# Altium PCB board.PcbDoc (part 1 of 2)
Units mm, origin at the board's own origin, x right, y up, seen from the top; angles counter-clockwise.
Board outline 50 x 15.5 mm, 4 copper layers (Top Layer, GND, PWR, Bottom Layer), stack 1.522 mm thick; 76 components, 98 nets, 369 pads, 198 vias.
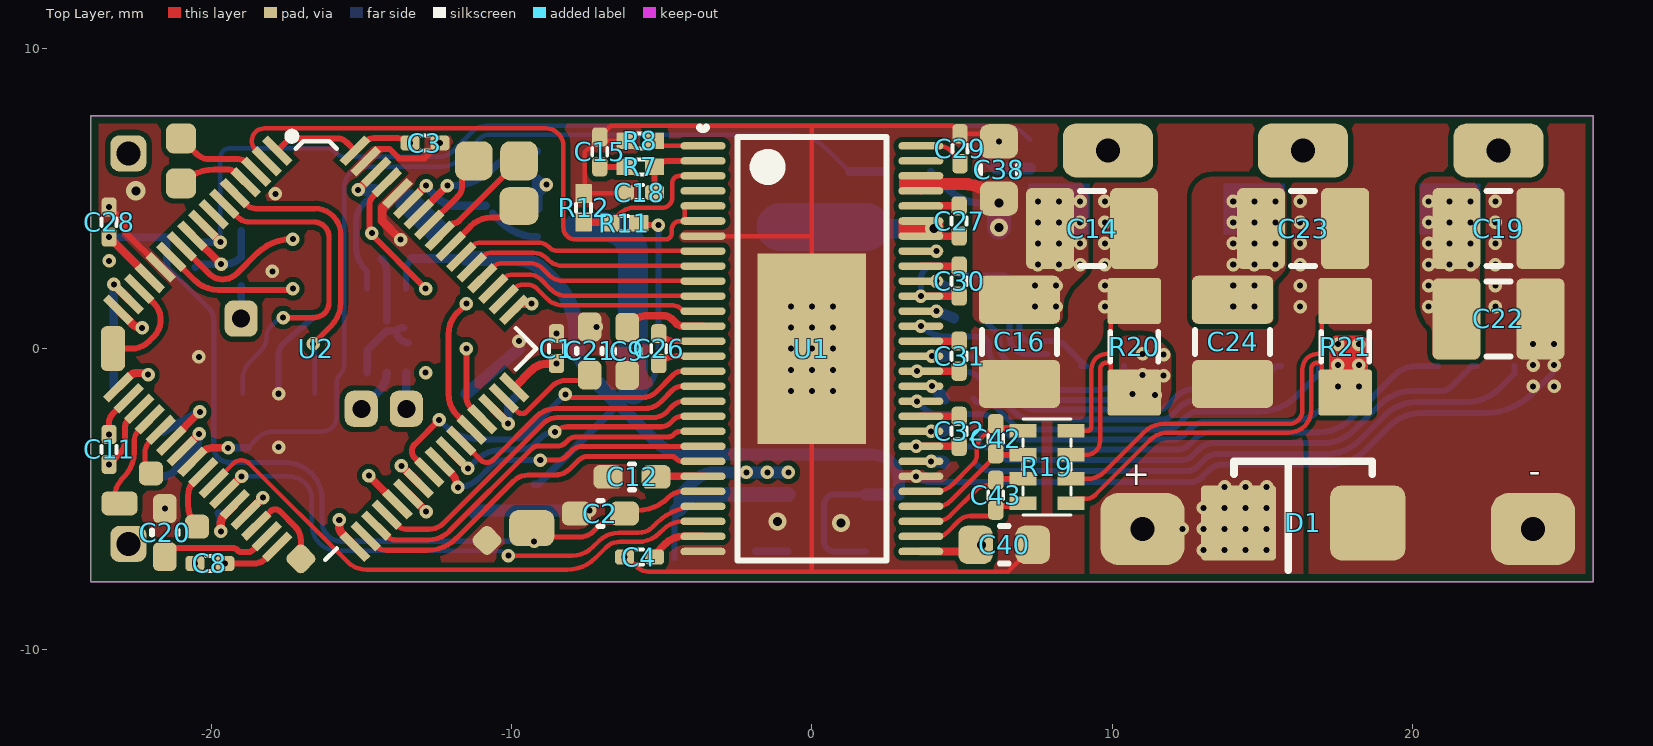
[diagram p0: Top Layer view]
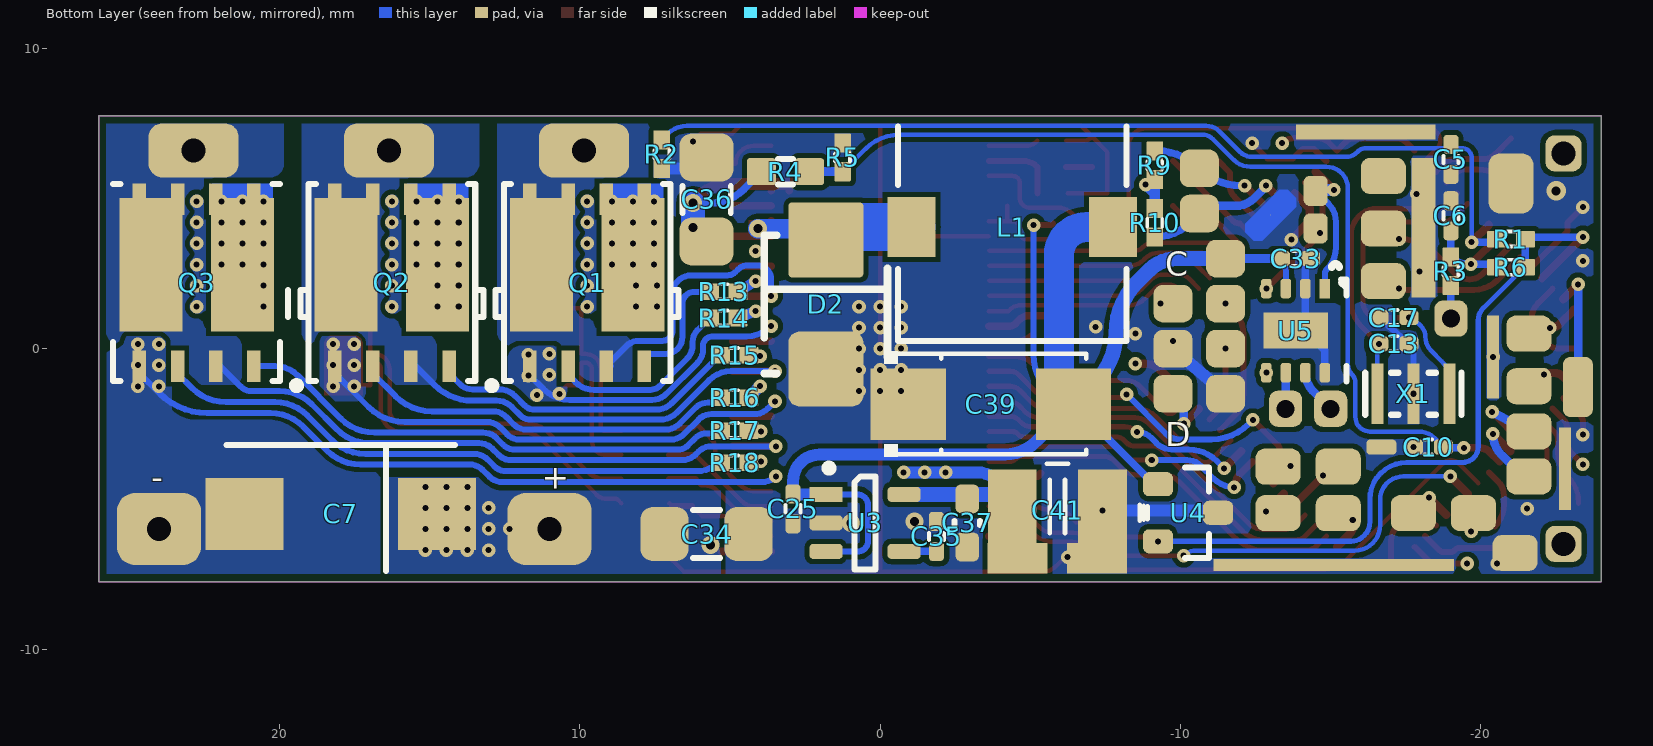
[diagram p1: Bottom Layer view, seen from below]
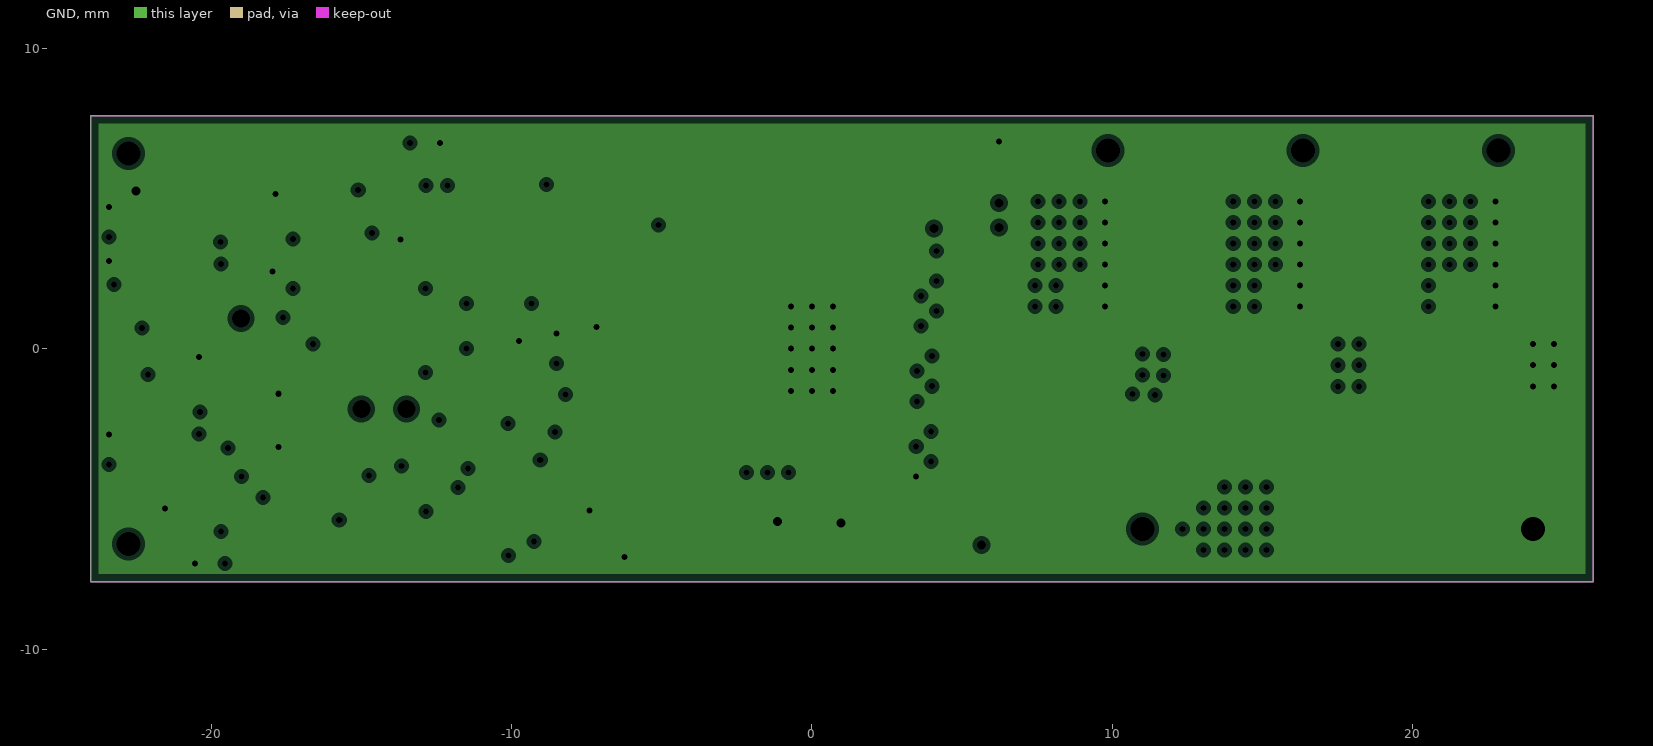
[diagram p2: GND, clearances drawn from the general rule]
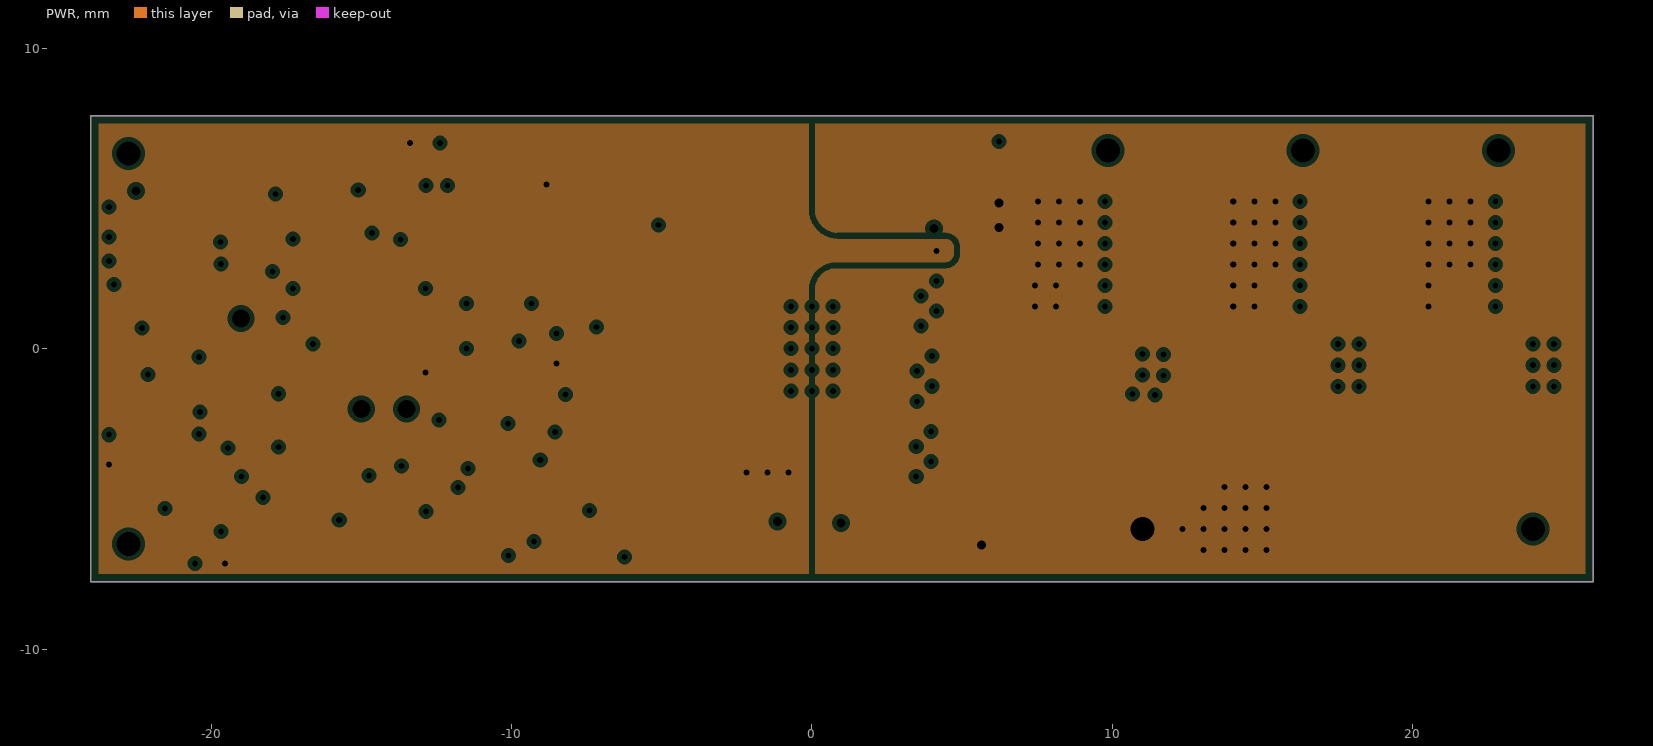
[diagram p3: PWR, clearances drawn from the general rule]
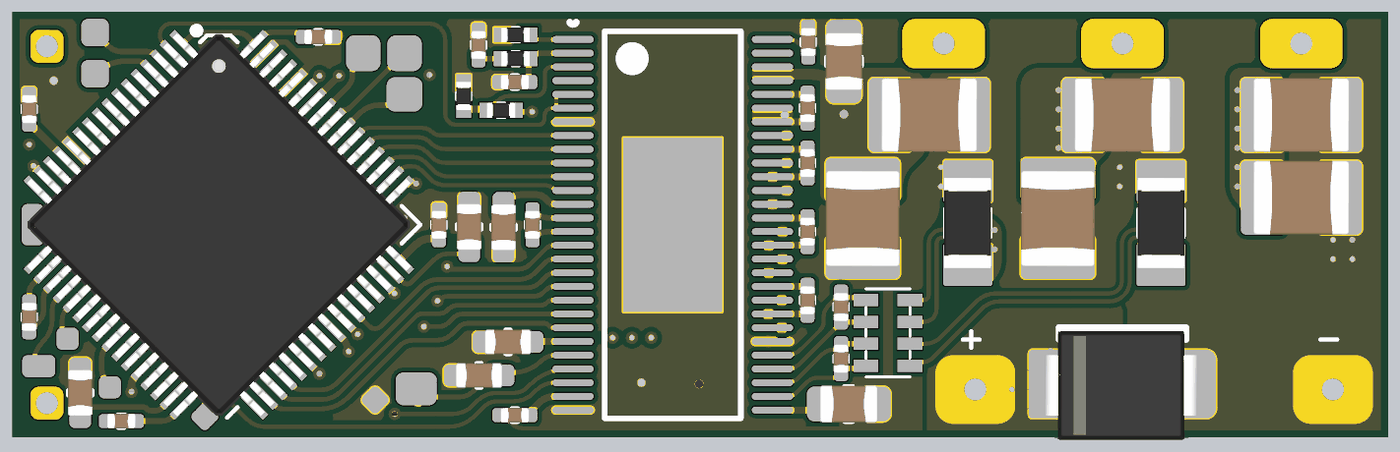
[diagram p5: 3D render of the assembled board from above, using the file's embedded part models]
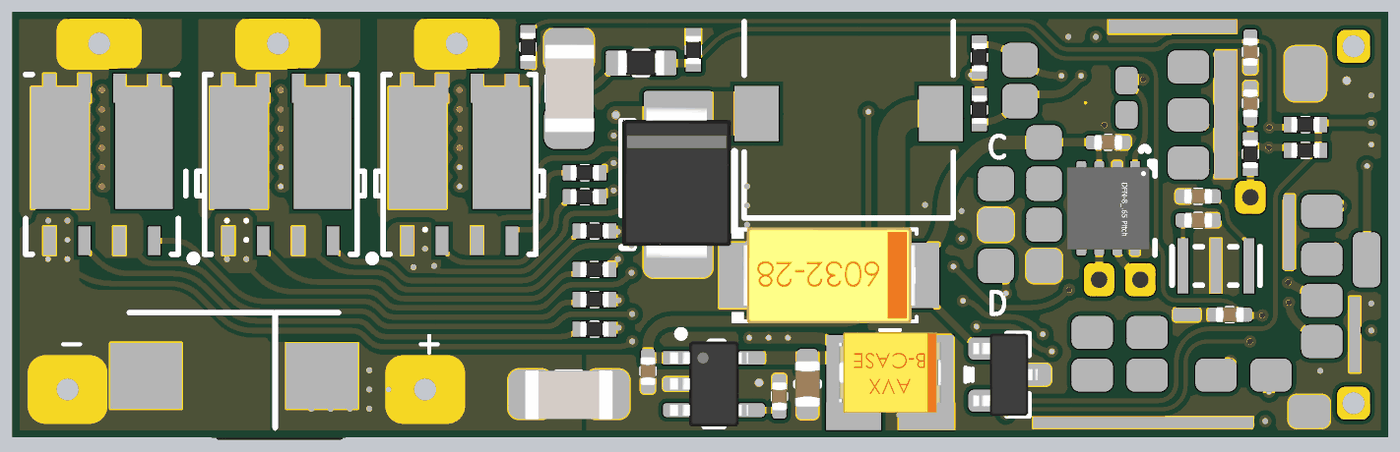
[diagram p6: 3D render of the assembled board from below, using the file's embedded part models]

## Layer stack, top to bottom
Top Solder: solder mask 0.01, Solder Resist, Dk 3.5
Top Layer: signal copper 0.018
Dielectric1: prepreg 0.125, FR-4, Dk 4.2
GND: plane copper 0.018, net GND
Dielectric 3: core 1.2, FR-4, Dk 4.6
PWR: plane copper 0.018, net (Multiple Nets)
Dielectric 4: core 0.125, FR-4, Dk 4.2
Bottom Layer: signal copper 0.018
Bottom Solder: solder mask 0.01, Solder Resist, Dk 3.5

## Board outline
-24,-7.75 26,-7.75 26,7.75 -24,7.75

## Design rules (kind name [scope] priority, off if disabled: settings)
AcuteAngle [All] p1: minimum=6.00000000000000E+0001 checktracksonly=FALSE
BoardOutlineClearance [All] p1: gap=0.25 ignorepadtopadclearanceinfootprint=FALSE
Clearance Clearance_1 [All] p1: gap=0.15 ignorepadtopadclearanceinfootprint=FALSE except(0.13: Arc-Arc Arc-Track Track-Track; 0.17: Arc-Fill Arc-Poly Arc-Region Track-Fill Track-Poly Track-Region SMDPad-Fill SMDPad-Poly SMDPad-Region THPad-Fill THPad-Poly THPad-Region Via-Fill Via-Poly Via-Region Fill-Fill Fill-Poly Fill-Region Poly-Poly Poly-Region Region-Region)
ComponentClearance [All] p1: gap=0.3 collisioncheckmode=3 verticalgap=0.254 showdistances=FALSE
HoleSize [All] p1: absolutevalues=TRUE maxlimit=6 minlimit=0.2 maxpercent=80.000 minpercent=20.000
HoleToHoleClearance HoleToHoleClearance_1 [IsVia vs IsThruPin] p1: gap=0.7 allowstackedmicrovias=TRUE
HoleToHoleClearance [All] p2: gap=0.5 allowstackedmicrovias=TRUE
PlaneClearance [All] p1: clearance=0.15
PlaneConnect [All] p1: planeconnectstyle=Direct reliefexpansion=0.3 reliefentries=4 reliefconductorwidth=0.381 reliefairgap=0.178
PolygonConnect [All] p1: connectstyle=Direct reliefconductorwidth=0.381 reliefentries=4 polygonreliefangle="90 Angle" airgapwidth=0.356
RoutingVias [All] p1: holewidth=0.3 width=0.6 viastyle="Through Hole" minholewidth=0.2 minwidth=0.45 maxholewidth=0.9 maxwidth=1.27
SolderMaskExpansion [All] p1: expansion=0.05 istentingtop=FALSE
SupplyNets "Schematic Supply Nets_3" [InNet('GND')] p1: voltage=0.000
SupplyNets "Schematic Supply Nets_9" [InNet('Ub')] p2: voltage=0.000
SupplyNets "Schematic Supply Nets_8" [InNet('3V3')] p3: voltage=0.000
SupplyNets "Schematic Supply Nets_2" [InNet('3V3_REF')] p4: voltage=0.000
SupplyNets "Schematic Supply Nets_1" [InNet('5V')] p5: voltage=0.000
UnRoutedNet [All] p1: checkbadconnections=TRUE
Width [All] p1: maxlimit=3.81 minlimit=0.14 preferedwidth=0.254
24 further rules are at their usual default settings.

## Components (designator, comment, footprint, x,y, rotation, side; value= is the part's Value field where it differs from the comment)
C1 "100nF" C0402 -8.5,0 r270 top
C2 "2.2uF" C0603 -7.041,-5.486 r0 top
C3 "100nF" C0402 -12.883,6.845 r180 top
C4 "2.2uF" C0402 -5.739,-6.934 r0 top
C5 "100n" C0402 -19,6.3 r90 bottom
C6 "100n" C0402 -19,4.424 r270 bottom
C7 "15uF 75V" RR_7343 17.951,-5.5 r0 bottom value="CAP TANT POLY 15UF 75V 7343 75mOhm"
C8 "100nF" C0402 -20.041,-7.15 r0 top
C9 "2.2uF" C0603 -6.15,-0.089 r90 top
C10 "100n" C0402 -18.25,-3.275 r180 bottom
C11 "100nF" C0402 -23.393,-3.353 r270 top
C12 "2.2uF" C0603 -5.987,-4.267 r0 top
C13 "18pF" C0402 -17.1,0.163 r0 bottom
C14 "2u2 100V" C1210-1.8MM 9.326,4 r180 top
C15 "6.8n" C0402 -7.061,6.551 r270 top
C16 "2u2 100V" C1210-1.8MM 6.909,0.229 r90 top
C17 "18pF" C0402 -17.1,1.037 r180 bottom
C18 "120p" C0402 -5.739,5.199 r0 top
C19 "2u2 100V" C1210-1.8MM 22.85,4 r180 top
C20 "2.2uF" C0603 -21.539,-6.121 r270 top
C21 "2.2uF" C0603 -7.4,-0.076 r270 top
C22 "2u2 100V" C1210-1.8MM 22.85,0.99 r180 top
C23 "2u2 100V" C1210-1.8MM 16.35,4 r180 top
C24 "2u2 100V" C1210-1.8MM 14,0.229 r90 top
C25 "100nF" C0402 2.9,-5.33 r90 bottom
C26 "22n" C0402 -5.098,0 r270 top
C27 "100n" C0402 4.9,4.25 r90 top
C28 "1uF" C0402 -23.393,4.212 r270 top
C29 "10nF" C0402 4.928,6.655 r270 top
C30 "220n" C0402 4.9,2.25 r90 top
C31 "220n" C0402 4.9,-0.25 r90 top
C32 "220n" C0402 4.9,-2.75 r90 top
C33 "100nF" C0402 -13.83,3 r0 bottom
C34 "2.2u" C1206 5.775,-6.17 r0 bottom
C35 "10nF" C0402 -1.875,-6.25 r270 bottom
C36 "2.2u" C1206 5.775,4.966 r270 bottom
C37 "2.2uF" C0603 -2.9,-5.8 r90 bottom
C38 "100nF" C0805 6.223,5.948 r270 top
C39 "220u" C6028 -3.689,-1.844 r0 bottom
C40 "100nF" C0805 6.401,-6.528 r180 top
C41 "100u" C3528 -5.9,-5.385 r0 bottom
C42 "1n" C0402 6.121,-2.997 r90 top
C43 "1n" C0402 6.121,-4.877 r90 top
D1 "SMF54A" SMB 16.35,-5.8 r180 top value="TVS DIODE 54VWM 87.1VC SOD123F"
D2 "CDBB2100" SMB 1.803,1.473 r90 bottom value="TVS DIODE 54VWM 87.1VC SOD123F"
L1 "33uH" RR_IND_DR74 -4.4,4.05 r180 bottom
Q1 "SI7252DP" PQFN_5X6 9.75,2.2 r270 bottom
Q2 "SI7252DP" PQFN_5X6 16.25,2.2 r270 bottom
Q3 "SI7252DP" PQFN_5X6 22.75,2.2 r270 bottom
R1 "10k" R0402 -21,3.647 r0 bottom
R2 "10k NTC" R0402 7.264,6.477 r270 bottom
R3 "10k" R0402 -19,2.575 r270 bottom
R4 "39k" R0603 3.15,5.89 r0 bottom
R5 "2k2" R0402 1.25,6.366 r270 bottom
R6 "10k" R0402 -21,2.71 r0 bottom
R7 "15k" R0402 -5.715,6.051 r180 top
R8 "220k" R0402 -5.715,6.918 r0 top
R9 "2k" R0402 -9.144,6.102 r270 bottom
R10 "2k" R0402 -9.144,4.195 r90 bottom
R11 "18k" R0402 -6.239,4.171 r0 top
R12 "3k3" R0402 -7.6,4.69 r270 top
R13 "4R7" R0402 5.2,1.895 r0 bottom
R14 "4R7" R0402 5.2,1.022 r0 bottom
R15 "4R7" R0402 4.844,-0.225 r0 bottom
R16 "4R7" R0402 4.844,-1.631 r0 bottom
R17 "4R7" R0402 4.844,-2.725 r0 bottom
R18 "4R7" R0402 4.844,-3.801 r0 bottom
R19 "100" RR_1206_ARRAY_4X 7.823,-4.737 r270 top
R20 "20mR" R1206 10.726,0.064 r270 top
R21 "20mR" R1206 17.75,0.064 r270 top
U1 "DRV8301DCAR" RR_HTSSOP56 0,0 r180 top value="DRV 8301 - IC MOTOR CONTROLLER SPI 56HTSSOP"
U2 "STM32F405RGT6" LQFP-64 -16.5,0 r315 top
U3 "TPS73233DBVT" SOT-23-5 0.5,-5.8 r0 bottom value="LDO 3.3V 250mA"
U4 "LT1460KCS3-3.3" SOT-23 -10.25,-5.461 r0 bottom
U5 "SIT1042QTK/3" DFN8_3X3_P065 -13.83,0.6 r270 bottom
X1 "CSTCE8M00G55-R0" RR_CRYSTAL_3.2X1.3 -17.75,-1.5 r0 bottom value="CER RES 8.0000MHZ 33PF SMD"

## Footprints (in the part's own frame and the unit in brackets; to place one, negate y for a bottom-side part, rotate by r counter-clockwise, add the part's x,y. Pads: shape width x height; smd on the part's side, far side on the other; paste and mask are expansions set on the pad)
C0402 [mm] "Chip Capacitor Body"
  rrect50% 0.635x0.508 smd mask+0.05: 1(-0.5,0) 2(0.5,0)
  silkscreen extent -0.13,-0.25 0.13,0.25, body extent -0.52,-0.27 0.53,0.28, height 0.55
C0603 [mil] "Chip Capacitor"
  rrect50% 38x31 smd mask+1.97: 1(-31.5,0) 2(31.5,0)
  silkscreen extent -3,-17 3,17, body extent -33,-18 33,18, height 35
C0805 [mil] "Chip Capacitor"
  rrect50% 45x50 smd mask+1.97: 1(-37.5,0) 2(37.5,0)
  silkscreen extent -6,-25 6,25, body extent -41,-27 41,27, height 53
C1206 [mm] "Chip Capacitor"
  rrect50% 1.6x1.8 smd: 1(-1.4,0) 2(1.4,0)
  silkscreen extent -0.45,-0.8 0.45,0.8, body extent -1.6,-0.88 1.6,0.92, height 1.6
C1210-1.8MM [mm] "Chip Capacitor"
  rrect25% 1.6x2.7 smd mask+0.05: 1(-1.4,0) 2(1.4,0)
  silkscreen extent -0.4,-1.25 0.4,1.25, body extent -1.75,-1.35 1.75,1.35, height 1.8
C3528 [mil] "C3528_1"
  rect 64x108 smd: 1(-59.06,0) 2(59.06,0)
  silkscreen extent -118,-61 14,30, body extent -73,-58 73,58, height 80
C6028 [mm] "C6028 C"
  rect 2.5x2.376 smd paste+0 mask+0.051: 1(2.75,0) 2(-2.75,0)
  silkscreen extent -3.18,-1.75 3.56,1.75, body extent -3.15,-1.75 3.15,1.75, height 2.8
DFN8_3X3_P065 [mm]
  rect 0.65x0.35 smd mask+0.05: 1(-1.4,0.975)
  rrect50% 0.65x0.35 smd mask+0.05: 2(-1.4,0.325) 3(-1.4,-0.325) 4(-1.4,-0.975) 5(1.4,-0.975) 6(1.4,-0.325) 7(1.4,0.325) 8(1.4,0.975)
  rect 1.2x2.15 smd mask+0.05: 9(0,0)
  silkscreen extent -2.23,1.2 1.7,1.7, body extent -1.51,-1.5 1.51,1.5, height 0.8
LQFP-64 [mil]
  rect 46x11 smd mask+0.98: 1(-219.5,147.64) 2(-219.5,127.95) 3(-219.5,108.27) 4(-219.5,88.58) 5(-219.5,68.9) 6(-219.5,49.21) 7(-219.5,29.53) 8(-219.5,9.84) 9(-219.5,-9.84) 10(-219.5,-29.53) 11(-219.5,-49.21) 12(-219.5,-68.9) 13(-219.5,-88.58) 14(-219.5,-108.27) 15(-219.5,-127.95) 16(-219.5,-147.64) 33(219.5,-147.64) 34(219.5,-127.95) 35(219.5,-108.27) 36(219.5,-88.58) 37(219.5,-68.9) 38(219.5,-49.21) 39(219.5,-29.53) 40(219.5,-9.84) 41(219.5,9.84) 42(219.5,29.53) 43(219.5,49.21) 44(219.5,68.9) 45(219.5,88.58) 46(219.5,108.27) 47(219.5,127.95) 48(219.5,147.64)
  rect 11x46 smd mask+0.98: 17(-147.64,-219.5) 18(-127.95,-219.5) 19(-108.27,-219.5) 20(-88.58,-219.5) 21(-68.9,-219.5) 22(-49.21,-219.5) 23(-29.53,-219.5) 24(-9.84,-219.5) 25(9.84,-219.5) 26(29.53,-219.5) 27(49.21,-219.5) 28(68.9,-219.5) 29(88.58,-219.5) 30(108.27,-219.5) 31(127.95,-219.5) 32(147.64,-219.5) 49(147.64,219.5) 50(127.95,219.5) 51(108.27,219.5) 52(88.58,219.5) 53(68.9,219.5) 54(49.21,219.5) 55(29.53,219.5) 56(9.84,219.5) 57(-9.84,219.5) 58(-29.53,219.5) 59(-49.21,219.5) 60(-68.9,219.5) 61(-88.58,219.5) 62(-108.27,219.5) 63(-127.95,219.5) 64(-147.64,219.5)
  silkscreen extent -224,-187 204,204, body extent -236,-236 236,236, height 59
PQFN_5X6 [mm]
  rect 1.05x0.45 smd mask+0.05: 1(2.78,-1.905) 2(2.78,-0.635) 3(2.78,0.635) 4(2.78,1.905) 5(-2.78,1.905) 6(-2.78,0.635) 7(-2.78,-0.635) 8(-2.78,-1.905)
  rect 4.44x2.1 smd mask+0.05: 6(-0.6,1.524) 8(-0.6,-1.524)
  silkscreen extent -3.28,-3.3 3.55,3.05, body extent -3.13,-2.63 3.13,2.63, height 1.17
R0402 [mm]
  rrect10% 0.635x0.55 smd mask+0.05: 1(-0.476,0) 2(0.476,0)
  silkscreen extent -0.12,-0.25 0.13,0.25, body extent -0.52,-0.27 0.53,0.28, height 0.4
R0603 [mil] "Chip Resistor; Body 1.6 x 0.8 mm (LxW typ)"
  rrect20% 38x35.43 smd mask+1.97: 1(-31.5,0) 2(31.5,0)
  silkscreen extent -10,-17 10,17, body extent -33,-18 33,18, height 22
R1206 [mil] "Chip Resistor"
  rrect10% 60x70 smd mask+1.97: 1(-60,0) 2(60,0)
  silkscreen extent -20,-31 20,31, body extent -65,-33 65,33, height 26
RR_1206_ARRAY_4X [mm]
  rect 0.45x0.9 smd mask+0.05: 1(0.4,-0.8) 2(0.4,0.8) 3(-0.4,-0.8) 4(-0.4,0.8) 5(-1.2,-0.8) 6(-1.2,0.8) 7(-2,-0.8) 8(-2,0.8)
  silkscreen extent -2.4,-0.8 0.8,0.8, body extent -2.4,-0.8 0.8,0.8, height 1
RR_7343 [mm] "Capacitor, SM Tantalum; Body 7.3 x 4.3 mm (LxW typ)"
  rect 2.6x2.4 smd mask+0.05: 1(-3.2,0) 2(3.2,0)
  silkscreen extent -3.8,-2.3 3.8,1.9, body extent -3.65,-2.15 3.65,2.15, height 4.5
RR_CRYSTAL_3.2X1.3 [mm]
  rect 0.4x2 smd mask+0.05: 1(1.2,0) 2(0,0) 3(-1.2,0)
  silkscreen extent -1.6,-0.7 1.6,0.7, body extent -1.6,-0.7 1.6,0.7, height 0.9
RR_HTSSOP56 [mm]
  oval 1.5x0.25 smd mask+0.05: 1(3.625,-6.75) 2(3.625,-6.25) 3(3.625,-5.75) 4(3.625,-5.25) 5(3.625,-4.75) 6(3.625,-4.25) 7(3.625,-3.75) 8(3.625,-3.25) 9(3.625,-2.75) 10(3.625,-2.25) 11(3.625,-1.75) 12(3.625,-1.25) 13(3.625,-0.75) 14(3.625,-0.25) 15(3.625,0.25) 16(3.625,0.75) 17(3.625,1.25) 18(3.625,1.75) 19(3.625,2.25) 20(3.625,2.75) 21(3.625,3.25) 22(3.625,3.75) 23(3.625,4.25) 24(3.625,4.75) 25(3.625,5.25) 26(3.625,5.75) 27(3.625,6.25) 28(3.625,6.75) 29(-3.625,6.75) 30(-3.625,6.25) 31(-3.625,5.75) 32(-3.625,5.25) 33(-3.625,4.75) 34(-3.625,4.25) 35(-3.625,3.75) 36(-3.625,3.25) 37(-3.625,2.75) 38(-3.625,2.25) 39(-3.625,1.75) 40(-3.625,1.25) 41(-3.625,0.75) 42(-3.625,0.25) 43(-3.625,-0.25) 44(-3.625,-0.75) 45(-3.625,-1.25) 46(-3.625,-1.75) 47(-3.625,-2.25) 48(-3.625,-2.75) 49(-3.625,-3.25) 50(-3.625,-3.75) 51(-3.625,-4.25) 52(-3.625,-4.75) 53(-3.625,-5.25) 54(-3.625,-5.75) 55(-3.625,-6.25) 56(-3.625,-6.75)
  rect 3.61x6.35 smd mask+0.05: 57(0,0)
  silkscreen extent -2.48,-7.37 3.74,7.05, body extent -3.1,-7.05 3.1,7.05, height 1.1
RR_IND_DR74 [mm] "Precision Wire Wound Inductor, 2-Leads, Body 7,60x7,60mm, IPC High Density"
  rect 1.6x2 smd mask+0.05: 1(-3.35,0) 2(3.35,0)
  silkscreen extent -3.8,-3.8 3.8,3.35, body extent -3.8,-3.8 3.8,3.8, height 4.35
SMB [mm]
  rrect30% 2.5x2.5 smd mask+0.05: 1(-2.15,0)
  rrect10% 2.5x2.5 smd mask+0.05: 2(2.15,0)
  silkscreen extent -2.3,-2.05 2.3,1.57, body extent -2.75,-1.93 2.85,2.02, height 2.65
SOT-23 [mm]
  rrect50% 1x0.8 smd mask+0.05: 1(1,-0.95) 2(1,0.95) 3(-1,0)
  silkscreen extent -0.7,-1.5 0.1,1.5, body extent -1.27,-1.5 1.33,1.5, height 1.1
SOT-23-5 [mm]
  rect 1.1x0.5 smd mask+0.05: 1(1.3,-0.95)
  rrect50% 1.1x0.5 smd mask+0.05: 2(1.3,0) 3(1.3,0.95) 4(-1.3,0.95) 5(-1.3,-0.95)
  silkscreen extent -0.35,-1.95 1.33,1.55, body extent -1.6,-1.55 1.6,1.55, height 1.45

## Part data
C1 C2 C3 C4 C8 C9 C11 C12 C15 C18 C25 C27 C29 C35 C37 C38 C40: library part CAP, "100nF 0402"
C5 C6 C10 C34 C36: library part CAP
C7: library part "Cap Pol2", "Polarized Capacitor (Axial)", Package=X, Distributor=KEMET, LatestRevisionDate=17-Jul-2002, LatestRevisionNote="Re-released for DXP Platform.", Order Number=T521X156M075ATE0357280, PackageDescription="Polarized Capacitor; 2 Leads", Published=8-Jun-2000, Publisher="Altium Limited"
C13 C17: library part CAP, "18pF 0402"
C14 C16 C19 C22 C23 C24: library part CAP, "2u2 100V 1210", LCSC part number=C92775, P/N=HMK325B7225KN-T
C20 C21: library part CAP, "2.2uF 0603"
C26 C30 C31 C32 C39 C41 C42 C43: library part CAP, LCSC part number=C56392, P/N=0402B104K250NT
C28: library part CAP, "1uF 0603"
C33: library part CAP, "100nF 50V 0402", LCSC part number=C110251, P/N=0402B104K500NT
D1 D2: library part Diode, "Default Diode", Package=SOD123F, Distributor="Littelfuse Inc.", Order Number=SMF54A
L1: library part 4.7uH, LCSC part number=C167208, P/N=FXL0420-4R7-M
Q1 Q2 Q3: library part SI7252DP-T1-GE3
R1 R3 R4 R5 R6 R7 R8 R11 R12: library part RES
R2: library part RES, "10k NTC 3380K 0402", LCSC part number=C77131, P/N=NCP15XH103F03RC
R9 R10 R19: library part RES, LCSC part number=C138007, P/N=RC0402FR-0730RL
R13 R14 R15 R16 R17 R18: library part RES, "4R7 0402", LCSC part number=C138007, P/N=RC0402FR-0730RL
R20 R21: library part RES, "5mR shunt 2512"
U1: library part DRV8301, Package=HTSSOP56, Distributor="Texas Instruments", Order Number=DRV8301DCAR
U2: library part STM32F405, "STM32 ARM-based 32-bit MCU"
U3: library part TPS7xx33, Package=SOT23-5, Distributor="Texas Instruments", Order Number=TPS73233DBVT
U4: library part NCP51460SN33T1G, "REF3033AIDBZR", LCSC part number=C36658, P/N=REF3033AIDBZR
U5: library part LTC2875, "IC INTERFACE CAN", LCSC part number=C5308062, P/N=SIT1042QTK/3
X1: library part CRYSTAL_3P, Package="3-SMD, Non-Standard", Distributor="Murata Electronics", Order Number=CSTCE8M00G55-R0

## Free pads (board coordinates)
  rrect50% 0.8x1.5 smd: 7(-23.265,0.003)
  rrect50% 1x2 smd far side: 7(-23.225,-1.275)
  rrect50% 1.2x0.8 smd: 7(-23.047,-5.15)
  rrect50% 0.8x0.8 smd: 7(-22,-4.15) 7(-20.462,-5.923)
  rrect50% 1.5x1.2 smd far side: 7(-21.6,-4.25) 7(-21.6,-2.75) 7(-21.6,-1.25) 7(-21.6,0.5) 7(-21.14,-6.8) 7(-19.75,-5.475) 7(-17.75,-5.475) 7(-16.75,2.25) 7(-16.75,4) 7(-16.75,5.75) 7(-15.25,-5.475) 7(-15.25,-3.925) 7(-13.25,-5.475) 7(-13.25,-3.925)
  rrect50% 1x1 smd: 7(-21,5.5) 7(-21,7)
  rrect50% 1.5x2 smd far side: 7(-21,5.5)
  rrect50% 0.8x0.8 smd rot 45: 7(-17.011,-6.994) 7(-10.817,-6.382)
  rrect50% 1x0.5 smd far side: 7(-16.687,-3.275)
  rrect50% 0.8x1 smd far side: 7(-14.5,4) 7(-14.5,5.25)
  rrect50% 1.3x1.25 smd far side: 7(-11.5,-1.5) 7(-11.5,0) 7(-11.5,1.5) 7(-11.5,3) 7(-10.625,4.5) 7(-10.625,6) 7(-9.75,1.5) 7(-9.75,-1.5) 7(-9.75,0)
  rrect50% 1.25x1.3 smd: 7(-11.25,6.25) 7(-9.75,6.25)
  rrect50% 1.3x1.25 smd: 7(-9.75,4.75)
  rrect50% 1.5x1.2 smd: 7(-9.325,-5.975)
  rect 2x1 smd far side: 9(-7.225,-6.975) 9(-4.575,-6.975)
  rect 0.4x2.75 smd far side: 10(-22.796,-4) 10(-20.404,-0.275)
  rect 0.8x4.65 smd far side: 10(-18.091,4.025)
  rect 4.65x0.5 smd far side: 10(-16.166,7.214)
  rect 8x0.4 smd far side: 10(-15.1,-7.2)
  round 0.025 smd far side: 10(-13.005,4.445)
  rrect50% 2.8x2.4 hole 0.8: +(11,-6) -(24,-6)
  rrect50% 1.2x1.2 hole 0.8: -(-22.75,-6.5) -(-22.75,6.5)
  rrect50% 1.1x1.2 hole 0.6: -(-19,1) -(-15,-2) -(-13.5,-2)
  rrect50% 3x1.8 hole 0.8: PH(9.85,6.6) PH(16.35,6.6) PH(22.85,6.6)

## Via types
v1: diameter 0.45, hole 0.2, Top Layer to Bottom Layer, tented both sides, 182 vias
v2: diameter 0.6, hole 0.3, Top Layer to Bottom Layer, tented both sides, 6 vias
v3: diameter 0.45, hole 0.2, Top Layer to Bottom Layer, tented bottom, 5 vias
v4: diameter 0.45, hole 0.2, Top Layer to Bottom Layer, tented top, 3 vias
v5: diameter 0.65, hole 0.3, Top Layer to Bottom Layer, 1 vias
v6: diameter 0.45, hole 0.2, Top Layer to Bottom Layer, 1 vias

## Nets (pads, with @x,y where several pads share a name; then routed paths per layer and width w, separated by ;. In a path a pad name is that pad's centre, name@x,y a point inside that pad or via, vN(x,y) a via of type N, cw(c..) or ccw(c..) an arc to the next point about the centre after c; other vN are vias at no path point)
3V3: C1.2 C3.2 C8.2 C11.2 C37.2 C41.2 pad.9@-4.575,-6.975 R9.2 R10.2 U1.49 U2.1 U2.19 U2.32 U2.48 U2.64 U3.5 U5.5 | length 22.9
  Top Layer w0.2: v4(-23.393,-3.853) -23.026,-3.486 ccw(c-23.398,-3.113) -22.872,-3.113 -22.872,-2.642 cw(c-22.487,-2.642) -22.759,-2.37 U2.19@-22.387,-1.998 ; v4(-19.541,-7.15) -18.561,-7.15 ccw(c-18.561,-6.633) -18.195,-6.999 U2.32@-17.79,-6.594 ; U2.1@-17.79,6.594 -17.529,6.855 cw(c-17.191,6.517) -17.191,6.995 -15.787,6.995 cw(c-15.787,6.567) -15.485,6.87 U2.64@-15.209,6.594 -14.943,6.86 cw(c-14.58,6.496) -14.58,7.01 -13.781,7.01 cw(c-13.781,6.447) v4(-13.383,6.845)
  Top Layer w0.28: U2.48@-9.906,-1.291 -9.329,-0.714 cw(c-8.813,-1.23) -8.813,-0.5 v1(-8.5,-0.5)
  Bottom Layer w0.2: pad.9@-4.575,-6.975 -4.575,-5.808 cw(c-3.977,-5.808) C41.2@-4.4,-5.385
  Bottom Layer w0.35: R10.2@-9.144,4.671 R9.2@-9.144,5.5 ; -9.144,5.154 -8.908,5.39 R9.2@-9.144,5.626
  Bottom Layer w0.4: C41.2@-3.915,-4.9 C41.2@-4.4,-5.385 -4.4,-5.285 -4.4,-4.876 -3.936,-4.412 cw(c-3.218,-5.13) -3.218,-4.115 v1(-2.184,-4.115) v1(-1.483,-4.115) v1(-0.781,-4.115)
  Bottom Layer w0.5: C41.2@-4.5,-5.385 -4.4,-5.285 -3.965,-4.85 U3.5@-0.8,-4.85
  other v1: -12.855,-0.8 4.146,3.25 -8.839,5.459
3V3_REF: C2.2 C28.2 pad.7@-9.325,-5.975 R1.1 R6.1 U1.24 U2.13 U4.2 | length 30.1
  Top Layer w0.17: v1(-9.25,-6.411) -9.112,-6.273 -7.743,-6.273 ccw(c-7.743,-5.608) -7.272,-6.079 -7.113,-5.919 cw(c-6.738,-6.294) -6.738,-5.764 -6.518,-5.764 C2.2@-6.241,-5.486 ; C2.2@-5.987,-5.486 -5.887,-5.387 -5.823,-5.387 ccw(c-5.823,-3.905) -4.775,-4.953 cw(c-4.285,-5.443) -4.285,-4.75 U1.24@-3.625,-4.75
  Top Layer w0.28: v1(-23.393,3.712) U2.13@-22.033,2.351
  Bottom Layer w0.17: R6.1@-21.476,2.709 -21.437,2.709 -20.076,1.348 cw(c-20.48,0.944) -19.909,0.944 -19.909,-3.266 ccw(c-19.388,-3.266) -19.388,-3.787 -17.53,-3.787 cw(c-17.53,-5.015) -16.301,-5.015 -16.301,-5.774 ccw(c-15.665,-5.774) -15.665,-6.411 v1(-9.25,-6.411)
  Bottom Layer w0.25: v1(-23.393,3.712) R1.1@-21.541,3.712 ; R6.1@-21.476,2.709 R1.1@-21.476,3.647
  Bottom Layer w0.28: R1.1@-21.541,3.712 R1.1@-21.476,3.647
5V: C25.2 C33.2 C39.2 L1.2 pad.7@-11.5,3 R11.2 U3.1 U3.3 U4.1 U5.3 | length 44.4
  Top Layer w0.2: R11.2@-5.763,4.171 ccw(c-5.627,4.308) -5.627,4.115 v1(-5.112,4.115)
  Bottom Layer w0.2: U5.3@-13.505,2 -13.505,2.578 cw(c-12.908,2.578) C33.2@-13.33,3 ; C39.2@-5.658,-1.521 ccw(c-6.976,-0.203) -5.112,-0.203 v1(-5.112,4.115) ; U3.3@1.8,-6.75 0.749,-6.75 cw(c0.749,-6.401) 0.4,-6.401 0.4,-5.21 cw(c0.76,-5.21) 0.76,-4.85 U3.1@1.8,-4.85
  Bottom Layer w0.25: U4.1@-9.25,-4.511 -9.105,-4.511 C39.2@-6.439,-1.844
  Bottom Layer w0.3: C33.2@-13.33,3 pad.7@-11.5,3
  Bottom Layer w0.4: C39.2@-6.439,-1.844 -5.196,-3.088 ccw(c-4.15,-2.042) -4.15,-3.521 2.011,-3.521 cw(c2.011,-4.41) 2.9,-4.41 C25.2@2.9,-4.83 ; U3.1@1.8,-4.85 C25.2@2.9,-4.85
  Bottom Layer w0.5: pad.7@-11.5,3 -9.886,3 cw(c-9.886,1.69) -8.96,2.616 -8.544,2.201 cw(c-10.22,0.525) -7.85,0.525 ccw(c-5.537,0.525) -7.172,-1.111 C39.2@-6.439,-1.844
  Bottom Layer w1: L1.2@-7.75,4.05 -6.881,4.05 cw(c-6.881,3.119) -5.95,3.119 C39.2@-5.95,-1.356
#A0: pad.7@-23.265,0.003 U2.14 | length 3.4
  Top Layer w0.2: pad.7@-23.265,0.003 -22.651,0.003 ccw(c-22.651,0.833) -22.064,0.246 -21.904,0.407 ccw(c-22.458,0.961) -21.904,1.515 U2.14@-22.387,1.998
#A1: pad.7@-23.225,-1.275 U2.15 | length 4.1
  Top Layer w0.28: v6(-23.238,2.142) U2.15@-22.74,1.644
  Bottom Layer w0.28: v6(-23.238,2.142) -23.238,-1.262 pad.7@-23.225,-1.275
#A2: pad.7@-21.6,0.5 U2.16 | length 1
  Top Layer w0.28: U2.16@-23.094,1.291 -22.635,0.832 ccw(c-22.293,1.173) v1(-22.293,0.69)
#A3: pad.7@-21.6,-1.25 U2.17 | length 1.2
  Top Layer w0.28: U2.17@-23.094,-1.291 -22.716,-0.913 cw(c-22.465,-1.164) -22.465,-0.809 -22.153,-0.809 v1(-22.095,-0.867)
#A4: pad.7@-23.047,-5.15 U2.20 | length 3.2
  Top Layer w0.17: pad.7@-23.25,-5.15 -23.25,-5.122 cw(c-22.005,-5.122) -22.885,-4.242 ccw(c-23.683,-3.445) -22.555,-3.445 -22.555,-3.048 cw(c-22.134,-3.048) -22.432,-2.75 U2.20@-22.033,-2.351
#A5: pad.7@-22,-4.15 U2.21 | length 1.8
  Top Layer w0.17: pad.7@-22,-4.25 cw(c-21.518,-3.768) -22.2,-3.768 -22.2,-3.48 cw(c-21.584,-3.48) -22.019,-3.045 U2.21@-21.679,-2.705
#A6: pad.7@-21.6,-2.75 U2.22 | length 2.7
  Top Layer w0.25: U2.22@-21.326,-3.058 v1(-20.371,-2.104)
  Bottom Layer w0.3: pad.7@-21.6,-2.75 v1(-20.371,-2.104)
#A7: pad.7@-21.6,-4.25 U2.23 | length 2.8
  Top Layer w0.28: U2.23@-20.972,-3.412 v1(-20.399,-2.838)
  Bottom Layer w0.28: pad.7@-21.6,-4.25 ccw(c-21.6,-3.759) -21.253,-4.106 -20.691,-3.545 ccw(c-21.398,-2.838) v1(-20.399,-2.838)
#B2: pad.7@-19.75,-5.475 U2.28 | length 1.7
  Top Layer w0.28: v1(-19.677,-6.084) -19.677,-5.852 cw(c-19.194,-5.852) -19.535,-5.511 U2.28@-19.205,-5.18
  Bottom Layer w0.28: pad.7@-19.75,-5.475 cw(c-19.927,-5.652) -19.677,-5.652 v1(-19.677,-6.084)
#B3: pad.7@-9.75,4.75 U2.55 | length 2.8
  Top Layer w0.2: U2.55@-12.027,3.412 -11.361,4.078 cw(c-10.683,3.401) -10.683,4.359 -10.141,4.359 pad.7@-9.75,4.75
#B4: pad.7@-9.75,6.25 U2.56 | length 3.6
  Top Layer w0.2: U2.56@-12.381,3.766 -11.98,4.166 ccw(c-11.98,4.519) -11.731,4.269 pad.7@-9.75,6.25
#B5: pad.7@-11.25,6.25 U2.57 | length 2.7
  Top Layer w0.2: U2.57@-12.734,4.119 -11.792,5.061 ccw(c-12.144,5.414) -11.646,5.414 -11.646,5.854 pad.7@-11.25,6.25
#B6_SCL: pad.7@-10.625,6 R9.1 U2.58 | length 4.6
  Top Layer w0.25: U2.58@-13.088,4.473 v3(-12.133,5.427)
  Bottom Layer w0.25: v3(-12.133,5.427) -12.008,5.427 ccw(c-12.008,7.383) pad.7@-10.625,6 cw(c-9.231,4.606) -9.231,6.578 R9.1@-9.144,6.578
#B7_SDA: pad.7@-10.625,4.5 R10.1 U2.59 | length 4.8
  Top Layer w0.28: U2.59@-13.441,4.826 v3(-12.842,5.425)
  Bottom Layer w0.25: pad.7@-10.625,4.5 -10.339,4.214 ccw(c-9.144,5.41) R10.1@-9.144,3.719
  Bottom Layer w0.28: v3(-12.842,5.425) ccw(c-12.782,5.425) -12.825,5.383 -12.456,5.014 ccw(c-11.824,5.646) -11.824,4.752 pad.7@-10.857,4.752
#B10: pad.7@-17.75,-5.475 U2.29 | length 0.8
  Top Layer w0.28: U2.29@-18.851,-5.533 v1(-18.277,-4.959)
#B11: pad.7@-17.011,-6.994 U2.30 | length 2.9
  Top Layer w0.2: U2.30@-18.497,-5.887 -18.029,-5.418 cw(c-17.865,-5.582) -17.702,-5.418 -17.208,-5.913 cw(c-17.682,-6.387) -17.011,-6.387 pad.7@-17.011,-6.994
#B12: pad.7@-15.25,-5.475 U2.33 | length 1.1
  Top Layer w0.28: v1(-15.733,-5.695) -15.733,-5.882 ccw(c-15.279,-5.882) -15.6,-6.203 U2.33@-15.209,-6.594
#C2: pad.7@-16.75,4 U2.10 | length 4.6
  Top Layer w0.2: U2.10@-20.972,3.412 -20.037,2.477 ccw(c-19.626,2.889) -19.626,2.307 ccw(c-19.626,3.011) -19.128,2.513 -18.473,3.168 cw(c-17.323,2.019) -17.323,3.644 v1(-17.279,3.644)
#C3: pad.7@-16.75,2.25 U2.11 | length 4.5
  Top Layer w0.2: U2.11@-21.326,3.059 -20.554,2.286 ccw(c-19.763,3.077) -19.763,1.959 -17.317,1.959 v1(-17.279,1.996)
#C5: pad.7@-20.462,-5.923 U2.25 | length 2.1
  Top Layer w0.2: pad.7@-20.462,-5.923 cw(c-19.73,-5.191) -20.765,-5.191 -20.765,-4.881 cw(c-20.131,-4.881) -20.579,-4.433 U2.25@-20.265,-4.119
#C6: pad.7@-15.25,-3.925 U2.37 | length 1.3
  Top Layer w0.25: v1(-14.749,-4.225) U2.37@-13.795,-5.18
#C7: pad.7@-13.25,-5.475 U2.38 | length 0.8
  Top Layer w0.28: U2.38@-13.441,-4.826 v3(-12.842,-5.425)
#C8: pad.7@-13.25,-3.925 U2.39 | length 0.8
  Top Layer w0.28: v1(-13.661,-3.899) U2.39@-13.088,-4.473
#C14: pad.7@-21,7 U2.3 | length 2.9
  Top Layer w0.2: pad.7@-21,7 -20.492,6.492 ccw(c-20.046,6.938) -20.046,6.307 -19.092,6.307 cw(c-19.092,5.886) -18.794,6.184 U2.3@-18.497,5.887
#C15: pad.7@-21,5.5 U2.4 | length 2.4
  Top Layer w0.2: pad.7@-21,5.5 cw(c-19.879,4.379) -19.879,5.964 -19.457,5.964 cw(c-19.457,5.542) -19.158,5.841 U2.4@-18.851,5.533
CAN_H: pad.-@-15,-2 U5.7 | length 1.5
  Bottom Layer w0.28: pad.-@-15,-2 -14.407,-1.407 ccw(c-15.013,-0.8) U5.7@-14.155,-0.8
CAN_L: pad.-@-13.5,-2 U5.6 | length 1.2
  Bottom Layer w0.28: U5.6@-13.505,-0.8 -13.505,-1.995 pad.-@-13.5,-2
CAN_RX: pad.7@-14.5,4 U2.61 U5.4 | length 4.5
  Top Layer w0.2: U2.61@-14.148,5.533 -14.592,5.089 ccw(c-14.272,4.769) -14.725,4.769 -14.725,3.87 v1(-12.855,2)
  other v1: -14.65,3.85
CAN_TX: pad.7@-14.5,5.25 U2.62 U5.1 | length 5.1
  Top Layer w0.28: v1(-15.101,5.288) U2.62@-14.502,5.887
  Bottom Layer w0.2: U5.1@-14.805,2 -14.805,2.482 ccw(c-15.043,2.482) -14.875,2.65 cw(c-14.151,3.374) -15.175,3.374 -15.175,4.225 cw(c-14.33,4.225) -14.928,4.822 pad.7@-14.5,5.25
  Bottom Layer w0.28: pad.7@-14.538,5.288 pad.7@-14.5,5.25
  Bottom Layer w0.4: v1(-15.101,5.288) pad.7@-14.538,5.288
DC_CAL: U1.12 U2.50 | length 7.1
  Top Layer w0.15: U2.50@-10.259,1.644 -9.875,2.029 cw(c-9.635,1.789) -9.635,2.128 -9.459,2.128 cw(c-9.459,1.706) -9.161,2.004 -8.834,1.677 ccw(c-8.257,2.254) -8.257,1.438 -4.623,1.438 cw(c-4.623,1.044) -4.344,1.323 -4.271,1.25 U1.12@-3.625,1.25
DM: pad.7@-11.5,1.5 U2.44 | length 4.7
  Top Layer w0.2: v1(-11.5,1.5) -11.794,1.206 ccw(c-11.056,0.467) -12.1,0.467 -12.1,-1.507 ccw(c-11.091,-1.507) -11.805,-2.22 U2.44@-11.32,-2.705
DP: pad.7@-11.5,0 U2.45 | length 2.5
  Top Layer w0.2: v1(-11.5,0) -11.5,-1.602 ccw(c-10.98,-1.602) -11.348,-1.97 U2.45@-10.966,-2.351
EN_GATE: U1.16 U2.40 | length 12.2
  Top Layer w0.17: v1@-8.153,-1.622 -5.628,-1.622 ccw(c-5.628,-0.994) -5.183,-1.438 -4.605,-0.86 cw(c-4.339,-1.127) -4.339,-0.75 U1.16@-3.625,-0.75
  Top Layer w0.2: U2.40@-12.734,-4.119 -13.225,-3.628 cw(c-13.005,-3.408) -13.225,-3.188 v1(-12.408,-2.37)
  Bottom Layer w0.2: v1(-12.408,-2.37) -12.274,-2.504 ccw(c-11.035,-1.265) -11.035,-3.017 -9.961,-3.017 ccw(c-9.961,-2.387) -9.516,-2.832 v1(-8.204,-1.521)
FAULT: U1.5 U1.6 U2.2 | length 20.3
  Top Layer w0.15: U2.2@-18.505,6.602 -18.522,6.619 cw(c-18.227,6.914) -18.227,7.332 -8.856,7.332 cw(c-8.856,6.748) -8.272,6.748 -8.272,4.031 ccw(c-7.882,4.031) -7.882,3.641 -4.869,3.641 ccw(c-4.869,3.845) -4.664,3.845 -4.664,3.972 cw(c-4.386,3.972) -4.386,4.25 U1.6@-4.235,4.25 ; U1.5@-4.235,4.75 U1.6@-4.235,4.25 ; U1.6@-3.625,4.25 U1.6@-4.235,4.25
  Top Layer w0.2: U2.2@-18.505,6.602 U2.2@-18.144,6.24
FET_1H: R13.1 U1.47 | length 0.7
  Bottom Layer w0.35: v1(4.146,2.25) R13.1@4.724,1.894
FET_1L: R14.1 U1.45 | length 0.6
  Bottom Layer w0.35: v1(4.146,1.25) R14.1@4.724,1.021
FET_1L_RET: Q1.1 R19.6 R20.2 U1.44 | length 14.9
  Top Layer w0.15: R19.6@8.623,-3.537 9.128,-3.537 ccw(c9.128,-3.073) 9.592,-3.073 9.592,-0.684 cw(c9.815,-0.684) 9.815,-0.461 9.941,-0.461 9.941,-1.218 10.416,-1.218 R20.2@10.48,-1.282
  Bottom Layer w0.2: v1(3.625,0.75) ccw(c4.44,1.565) 4.44,0.412 5.559,0.412 cw(c5.559,0.072) 5.888,-0.015 ccw(c6.521,-0.015) 6.074,-0.462 7.12,-1.508 ccw(c7.587,-1.042) 7.587,-1.702 10.341,-1.702 ccw(c10.341,-0.487) 11.2,-1.346 Q1.1@11.655,-0.891
  other v1: 11.426,-1.546 10.674,-1.501 11.706,-0.896 11.004,-0.875 11.706,-0.194 11.004,-0.174
FET_1PH: C30.1 pad.PH@9.85,6.6 Q1.3 Q1.7 Q1.8 U1.46 | length 9.9
  Top Layer w0.25: v1(3.625,1.75) C30.1@4.9,1.75
  Bottom Layer w0.2: v1(3.625,1.75) 3.625,2.306 cw(c4.094,2.306) 4.094,2.775 4.41,2.775 cw(c4.41,2.338) 4.719,2.647 4.812,2.554 ccw(c5.086,2.827) 5.086,2.44 6.29,2.44 cw(c6.29,1.821) 6.909,1.821 6.909,0.6 ccw(c7.247,0.6) 7.247,0.262 8.026,0.262 cw(c8.026,-0.336) 8.448,0.087 Q1.3@9.115,-0.58 Q1.3@8.957,-0.58
FET_2H: R15.1 U1.42 | length 0.4
  Bottom Layer w0.4: v1(3.993,-0.25) R15.1@4.419,-0.25
FET_2L: R16.1 U1.40 | length 0.6
  Bottom Layer w0.4: v1(3.993,-1.25) cw(c3.993,-1.298) 4.027,-1.264 R16.1@4.419,-1.656
FET_2L_RET: Q2.1 R19.2 R21.2 U1.39 | length 28.4
  Top Layer w0.15: R19.2@8.623,-5.137 8.763,-4.997 9.116,-4.997 ccw(c9.116,-4.564) 9.423,-4.87 11.237,-3.056 cw(c11.878,-3.696) 11.878,-2.791 15.878,-2.791 ccw(c15.878,-2.053) 16.615,-2.053 16.615,-0.684 cw(c16.839,-0.684) 16.839,-0.461 16.965,-0.461 16.965,-1.218 17.44,-1.218 R21.2@17.504,-1.282
  Bottom Layer w0.2: v1(3.498,-1.75) 3.745,-1.997 ccw(c4.19,-1.552) 4.19,-2.181 5.613,-2.181 cw(c5.613,-2.788) 6.042,-2.359 6.53,-2.847 ccw(c6.954,-2.422) 6.954,-3.023 12.004,-3.023 ccw(c12.004,-2.443) 12.414,-2.853 12.646,-2.621 cw(c13.087,-3.063) 13.087,-2.438 15.825,-2.438 ccw(c15.825,-0.738) 17.027,-1.94 Q2.1@18.155,-0.812
  other v1: 17.504,-1.253 18.206,-1.253 17.504,-0.551 18.206,-0.551 17.504,0.151 18.206,0.151
FET_2PH: C31.1 pad.PH@16.35,6.6 Q2.3 Q2.7 Q2.8 U1.41 | length 14.6
  Top Layer w0.25: U1.41@3.625,-0.75 C31.1@4.9,-0.75
  Bottom Layer w0.2: v1(3.498,-0.75) 4.964,-0.75 cw(c4.964,-1.776) 5.689,-1.051 6.773,-2.134 ccw(c7.324,-1.584) 7.324,-2.362 11.633,-2.362 ccw(c11.633,-1.877) 11.976,-2.22 12.255,-1.94 cw(c12.764,-2.449) 12.764,-1.73 13.566,-1.73 ccw(c13.566,0.069) 14.838,-1.203 15.461,-0.58 Q2.3@15.615,-0.58
FET_3H: R17.1 U1.37 | length 0.5
  Bottom Layer w0.4: v1(3.968,-2.75) 4.297,-2.75 ccw(c4.297,-2.577) R17.1@4.419,-2.699
FET_3L: R18.1 U1.35 | length 0.5
  Bottom Layer w0.4: v1(3.968,-3.75) 4.297,-3.75 cw(c4.297,-3.923) R18.1@4.419,-3.801